# Altium PCB Main.PcbDoc
Units mm, origin at the board's own origin, x right, y up, seen from the top; angles counter-clockwise.
Board outline 25 x 42 mm, 2 copper layers (Top Layer, Bottom Layer); 7 components, 5 nets, 25 pads, 24 vias.
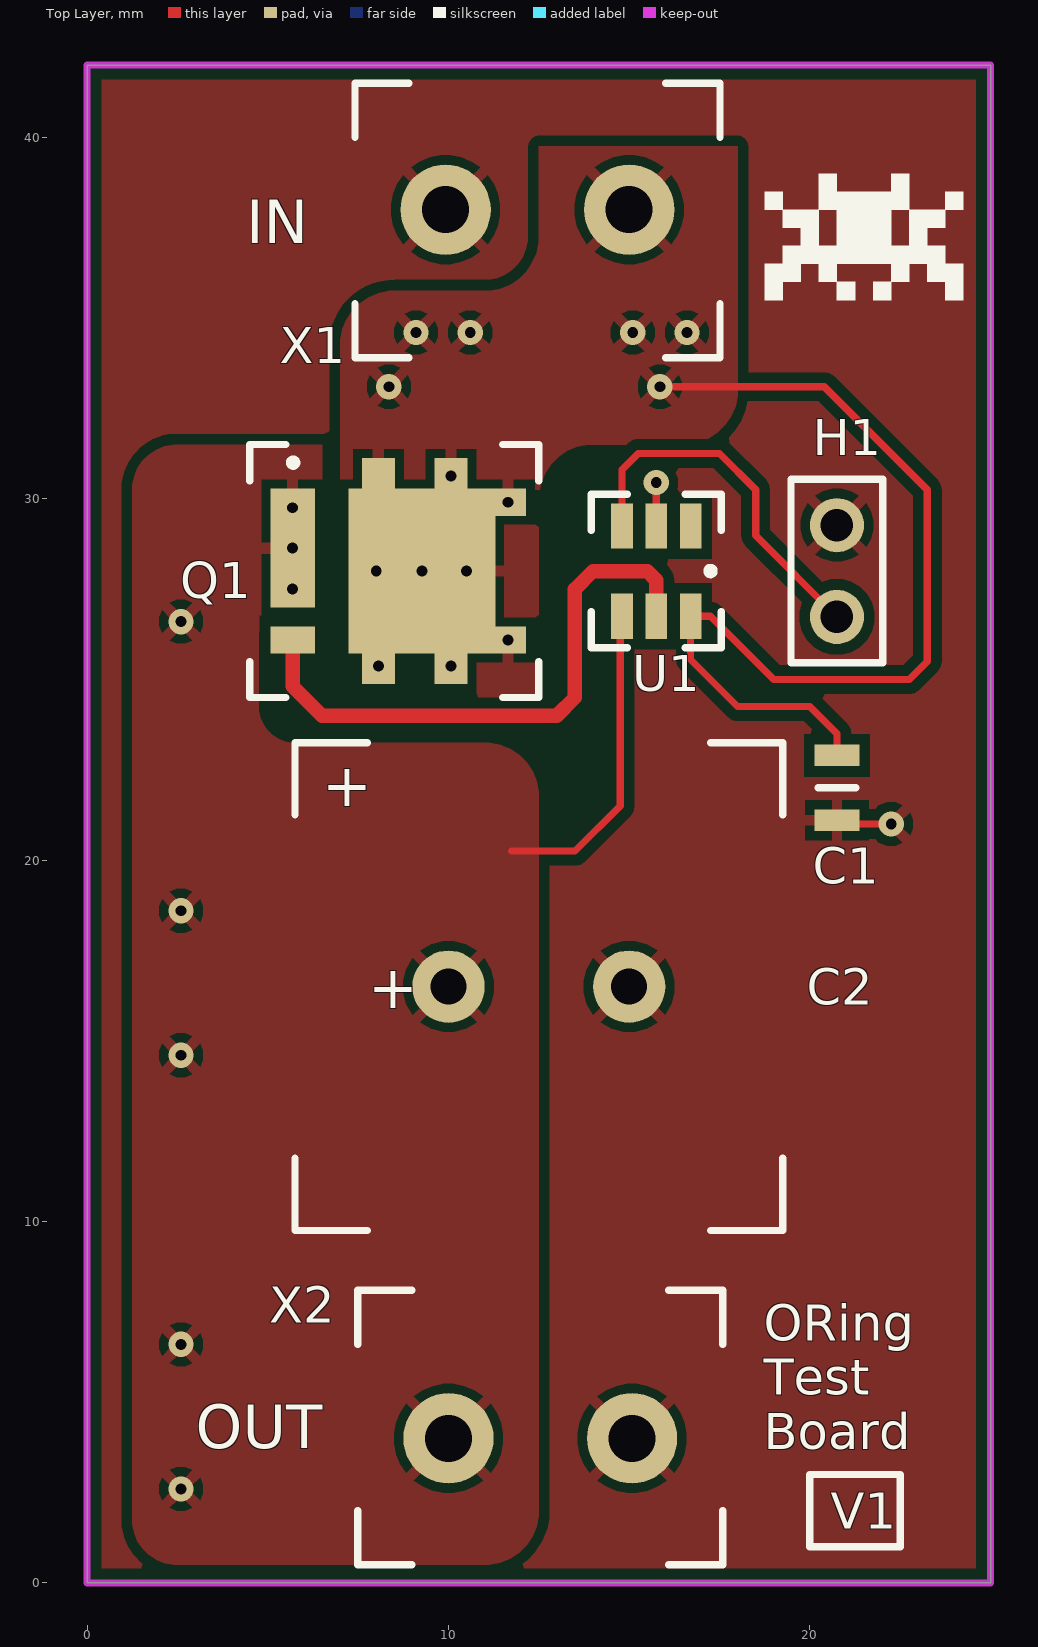
[diagram p0: Top Layer view]
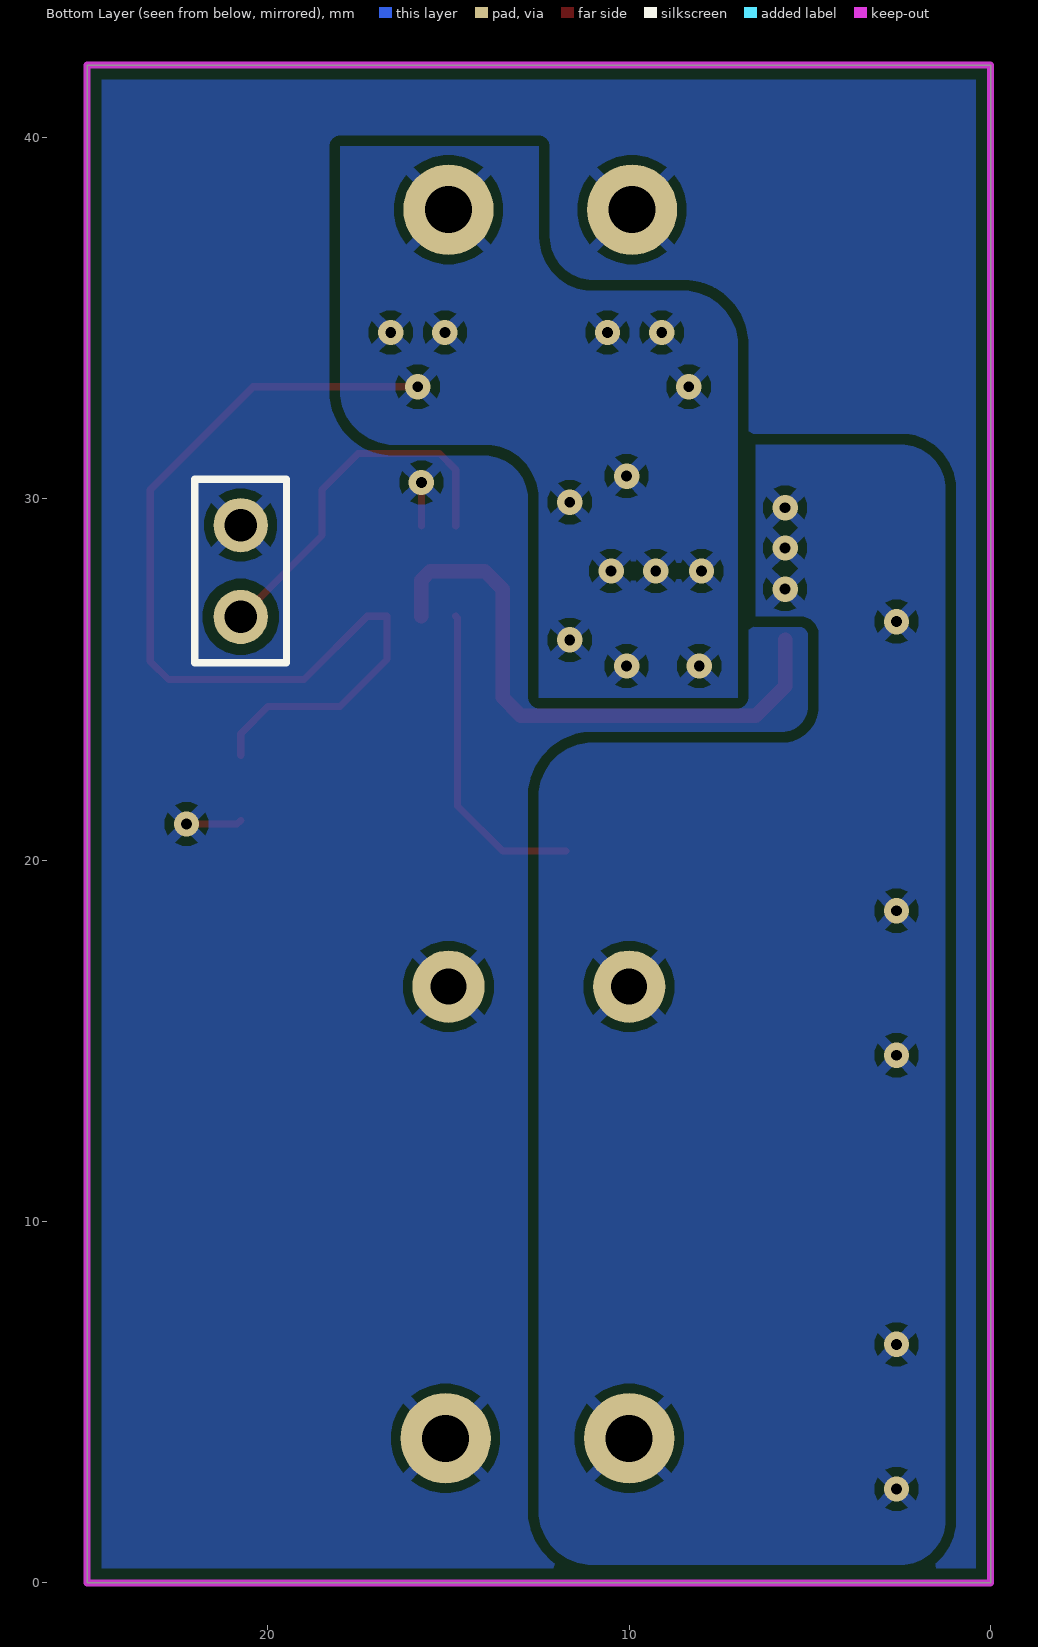
[diagram p1: Bottom Layer view, seen from below]
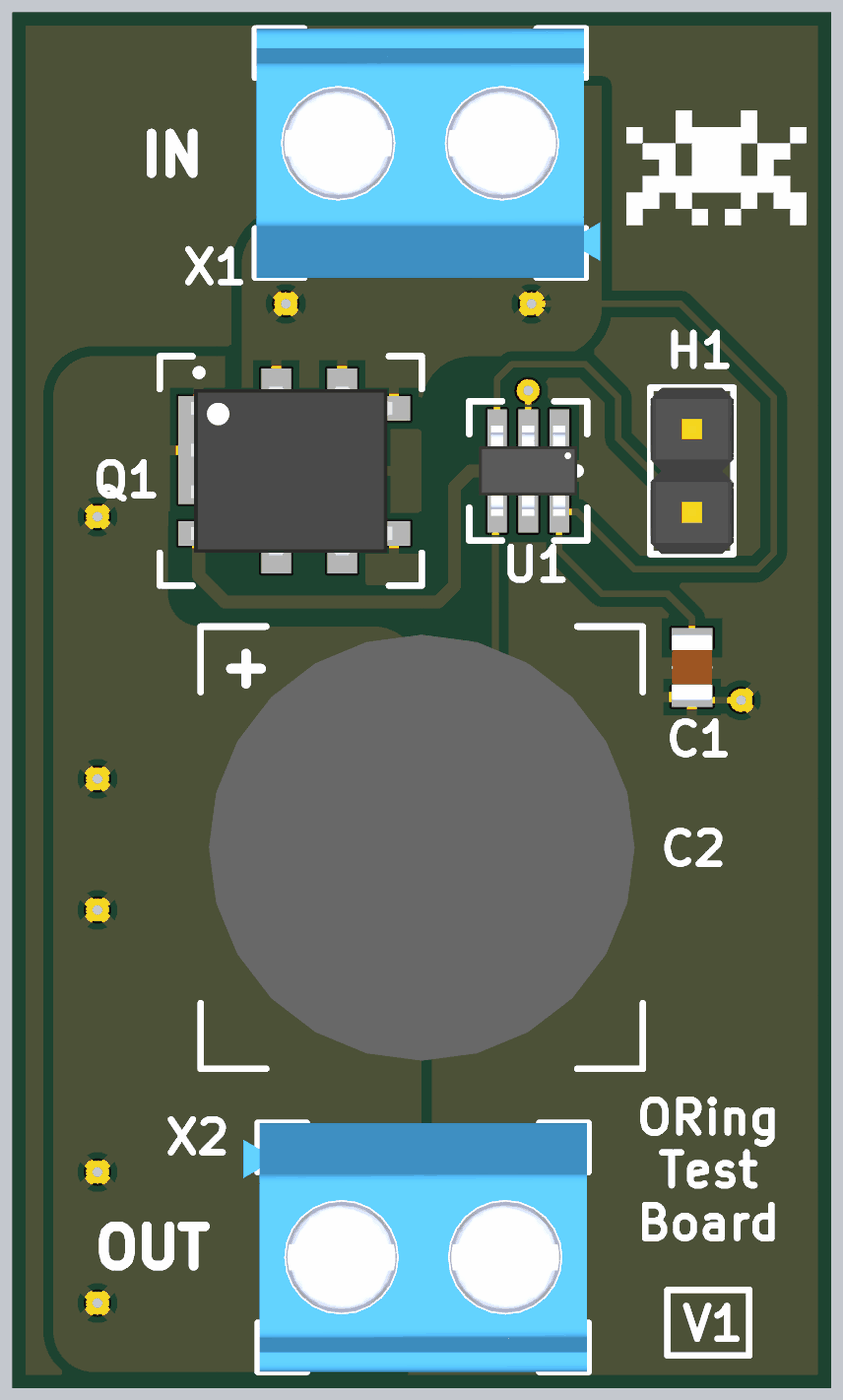
[diagram p2: 3D render of the assembled board from above, using the file's embedded part models]

## Layer stack, top to bottom
Top Solder: solder mask 0.0102, Solder Resist, Dk 3.5
Top Layer: signal copper 0.0356
Dielectric 1: dielectric 0.32, FR-4, Dk 4.8
Bottom Layer: signal copper 0.0356
Bottom Solder: solder mask 0.0102, Solder Resist, Dk 3.5

## Board outline
0,0 0,42 25,42 25,0

## Design rules (kind name [scope] priority, off if disabled: settings)
BoardOutlineClearance [All] p1: gap=0.2 ignorepadtopadclearanceinfootprint=FALSE
Clearance "inPolygon Clearance" [InPolygon] p1: gap=0.3 ignorepadtopadclearanceinfootprint=TRUE // this rule ensures that every net within a polygon of a different net has a set clearance from the poly
Clearance "Different Diff Pair" [All] p2: gap=0.2 ignorepadtopadclearanceinfootprint=TRUE
Clearance "Same Diff Pair" [All] p3: gap=0.1 ignorepadtopadclearanceinfootprint=TRUE
Clearance "Different Nets" [not InAnyDifferentialPair] p4: gap=0.3 ignorepadtopadclearanceinfootprint=TRUE except(0.1: Arc-SMDPad Arc-THPad Arc-Via Arc-Text Track-SMDPad Track-THPad Track-Via Track-Text SMDPad-Text THPad-Text Via-Text Fill-Text Poly-Text Region-Text Text-Text; 0.12: Arc-Arc Arc-Track Track-Track; 0.15: SMDPad-SMDPad SMDPad-THPad SMDPad-Via THPad-THPad THPad-Via Via-Via; 0.2: Arc-Hole Track-Hole SMDPad-Hole THPad-Hole Via-Hole Fill-Hole Poly-Hole Region-Hole Text-Hole)
Clearance "Same Net" [not InAnyDifferentialPair] p5: gap=0 ignorepadtopadclearanceinfootprint=TRUE except(0.1: THPad-Via; 0.18: Arc-Arc Arc-Track Track-Track)
ComponentClearance [All] p1: gap=0.102 collisioncheckmode=3 verticalgap=0.102 showdistances=TRUE
DiffPairsRouting "Ethernet Routing" [InDifferentialPairClass('Ethernet_Pairs')] p1: maxlimit=0.2 minlimit=0.2 mostfreqgap=0.2 toplayer_minwidth=0.25 toplayer_maxwidth=0.25 toplayer_prefwidth=0.25 bottomlayer_minwidth=0.25 bottomlayer_maxwidth=0.25 bottomlayer_prefwidth=0.25 impedanceprofiledriven=TRUE maxuncoupledlength=12.7
DiffPairsRouting "USB Routing" [InDifferentialPairClass('USB_Pairs')] p2: maxlimit=0.127 minlimit=0.127 mostfreqgap=0.127 toplayer_minwidth=0.23 toplayer_maxwidth=0.23 toplayer_prefwidth=0.23 bottomlayer_minwidth=0.23 bottomlayer_maxwidth=0.23 bottomlayer_prefwidth=0.23 impedanceprofiledriven=TRUE impedanceprofileid={F14BA31F-77FA-453E-8734-53F45B48A614} maxuncoupledlength=12.7
DiffPairsRouting "CAN Routing" [InDifferentialPairClass('CAN_Pairs')] p3: maxlimit=0.5 minlimit=0.5 mostfreqgap=0.5 toplayer_minwidth=0.201 toplayer_maxwidth=0.201 toplayer_prefwidth=0.201 bottomlayer_minwidth=0.201 bottomlayer_maxwidth=0.201 bottomlayer_prefwidth=0.201 maxuncoupledlength=12.7
Height [All] p1: minheight=0 maxheight=1816.048 prefheight=12.7
HoleSize [All] p1: absolutevalues=TRUE maxlimit=6.3 minlimit=0.3 maxpercent=80.000 minpercent=20.000
HoleToHoleClearance [All] p1: gap=0.25 allowstackedmicrovias=FALSE
Length [All] p1: maxlimit=43.432 minlimit=0 usedelayunits=TRUE mindelay=0.000000 maxdelay=10000.000000
MatchedLengths "Diff Pair Matched Delays" [InDifferentialPairClass('Ethernet_Pairs') or InDifferentialPairClass('USB_Pairs') or InDifferentialPairClass('CAN_Pairs')] p1: tolerance=5 checknetsindiffpair=TRUE checkdiffpairvsdiffpair=FALSE checkxsignals=FALSE checkothers=FALSE usedelayunits=TRUE delaytolerance=100.000000
MinimumAnnularRing [All] p1: minimumring=0.2
MinimumSolderMaskSliver [All] p1: minsoldermaskwidth=0
PlaneClearance "Supply Net Clearance" [InNetClass('Supply_Nets')] p1: clearance=0.5
PlaneClearance "All Nets" [All] p2: clearance=0.3
PolygonConnect "Supply Nets" [InNetClass('Supply_Nets')] p1: connectstyle=Relief reliefconductorwidth=0.3 reliefentries=4 polygonreliefangle="90 Angle" conductorbypadedge=TRUE mindistance=0.381 enablemindistance=FALSE airgapwidth=0.254
PolygonConnect General [All] p2: connectstyle=Relief reliefconductorwidth=0.254 reliefentries=4 polygonreliefangle="90 Angle" airgapwidth=0.254
RoutingVias [All] p1: holewidth=0.2 width=0.35 viastyle="Through Hole" minholewidth=0.15 minwidth=0.3 maxholewidth=6.3 maxwidth=6.55
SilkToSilkClearance [All] p1: silktosilkclearance=0
SilkToSolderMaskClearance [All] p1: minsilkscreentomaskgap=0 clearancetoexposedcopper=TRUE
SolderMaskExpansion [All] p1: expansion=0.075 istentingtop=FALSE
SupplyNets "Schematic Supply Nets_3" [InNet('GND')] p1: voltage=0.000
UnRoutedNet [All] p1: checkbadconnections=TRUE
Width "nRF Width" [InNetClass('nRF Signal')] p1: maxlimit=0.379 minlimit=0.379 preferedwidth=0.379 impedanceprofiledriven=TRUE minimp=50.000000 maximp=50.000000 favimp=50.000000 checkconnectedcopper=TRUE
Width [All] p2: maxlimit=100 minlimit=0.1 preferedwidth=0.3
20 further rules are at their usual default settings.

## Classes and differential pairs
net class Supply_Nets: "Batt EN" "Batt IN" "Batt OUT" GND NetQ1_2 NetU4_1
component class ORing: C1 C2 Q1 U1
component class Connectors: H1 X1 X2

## Components (designator, comment, footprint, x,y, rotation, side; value= is the part's Value field where it differs from the comment)
C1 "[Cap] 0805 0.1uF 10% 50V" "[Cap] SMD 0805" 20.75,22 r270 top
C2 "[Cap] Thru-Hole 1000uF 20% 35V" "[Cap] Thru-Hole Polarized 10mm" 12.5,16.5 r0 top
H1 "1x2 Header" "[Header] 1x2 Male" 20.75,28 r90 top
Q1 "NMOS" "[NMOS] SMD 40V 509A" 8.5,28 r270 top
U1 "[ORing] NMOS Controller" "[ORing] NMOS Controller" 15.75,28 r270 top
X1 "2pin Screw Terminal" "[Screw Terminal] 2pin 5mm" 12.5,38 r180 top
X2 "2pin Screw Terminal" "[Screw Terminal] 2pin 5mm" 12.5,4 r0 top

## Footprints (in the part's own frame and the unit in brackets; to place one, negate y for a bottom-side part, rotate by r counter-clockwise, add the part's x,y. Pads: shape width x height; smd on the part's side, far side on the other; paste and mask are expansions set on the pad)
"[Cap] SMD 0805" [mm]
  rect 0.6x1.25 smd: 1(-0.9,0) 2(0.9,0)
  silkscreen extent 0,-0.53 0,0.53, body extent -1,-0.63 1,0.63, height 1
"[Cap] Thru-Hole Polarized 10mm" [mm]
  round 2 hole 1: 1(-2.5,0) 2(2.5,0)
  silkscreen extent -6.75,-6.75 6.75,6.75, body extent -6.5,-6.49 6.5,6.49, height 26.5
"[Header] 1x2 Male" [mm]
  round 1.5 hole 0.9: 1(-1.27,0) 2(1.27,0)
  silkscreen extent -2.54,-1.27 2.54,1.27, body extent -2.54,-1.27 2.54,1.27, height 9.5
"[NMOS] SMD 40V 509A" [mm] "NTMFS0D4N04XMT1G"
  rect 3.29x1.23 smd: 1(-0.635,-2.815)
  rect 0.75x1.23 smd: 2(1.905,-2.815)
  rect 1x0.91 smd: 3(-2.627,1.57) 3(-2.627,-0.44) 3(2.627,1.57) 3(2.627,-0.44)
  rect 0.75x1 smd: 3(-1.905,3.145) 3(1.905,3.145)
  rect 4.56x4.06 smd: 3(0,0.765)
  silkscreen extent -3.5,-4 3.5,4, body extent -2.58,-3.05 2.58,3.1, height 1
"[ORing] NMOS Controller" [mm]
  rect 1.25x0.6 smd: 1(-1.25,0.95) 2(-1.25,0) 3(-1.25,-0.95) 4(1.25,-0.95) 5(1.25,0) 6(1.25,0.95)
  silkscreen extent -2.12,-1.8 2.12,1.8, body extent -1.38,-1.5 1.38,1.5, height 1.1
"[Screw Terminal] 2pin 5mm" [mm]
  round 2.5 hole 1.3: 1(-2.5,0) 2(2.58,0)
  silkscreen extent -5.01,-3.5 5.09,4.1, body extent -5.45,-3.5 5.05,4.1, height 9.99

## Part data
C1: "CL21B104KBCNNNC", Capacitance=100nF, Max Voltage=50V, Size Package=0805, Supplier Part Number 1=1276-1003-6-ND, Tolerance=10%, Supplier 1=DigiKey
C2: "35PK1000MEFC10X20", Capacitance=1000uF, Max Voltage=35V, Size Package=Thru-Hole, Supplier Part Number 1=399-9886-1-ND, Tolerance=20%, Supplier 1=DigiKey
H1: library part "[Header] 1x2 Male", "2.54mm pitch"
Q1: library part "[NMOS] SMD 40V 509A", "NTMFS0D4N04XMT1G", Supplier Part Number 1=488-NTMFS0D4N04XMT1GCT-ND, Supplier 1=DigiKey
U1: "NCV68061SNAIT1G", Supplier Part Number 1=488-NCV68061SNAIT1GCT-ND, Supplier 1=DigiKey
X1 X2: library part "[Screw Terminal] 2pin", "TB002-500-02BE", Supplier Part Number 1=102-6145-ND, Supplier 1=DigiKey

## Via types
v1: diameter 0.7, hole 0.3, Top Layer to Bottom Layer, 24 vias

## Nets (pads, with @x,y where several pads share a name; then routed paths per layer and width w, separated by ;. In a path a pad name is that pad's centre, name@x,y a point inside that pad or via, vN(x,y) a via of type N, cw(c..) or ccw(c..) an arc to the next point about the centre after c; other vN are vias at no path point)
"Batt EN": H1.1 U1.3 | length 10.3
  Top Layer w0.2: U1.3 14.8,30.8 15.25,31.25 17.5,31.25 18.5,30.25 18.5,28.98 H1.1
"Batt IN": C1.1 Q1.3 U1.6 X1.1 | length 27.5
  Top Layer w0.2: v1(15.85,33.1) 20.4,33.1 23.25,30.25 23.25,25.5 22.75,25 19,25 17.25,26.75 U1.6 16.7,25.55 18,24.25 20,24.25 20.75,23.5 C1.1
  other v1: 8.06,25.373 10.07,25.373 11.645,26.095 8,28 9.265,28 10.5,28 11.645,29.905 10.07,30.627 8.35,33.1 9.1,34.6 10.6,34.6 15.1,34.6 16.6,34.6
"Batt OUT": C2.1 Q1.1 U1.4 X2.1 | length 8.8
  Top Layer w0.2: 11.75,20.25 13.5,20.25 14.75,21.5 14.75,26.7 U1.4
  other v1: 2.6,2.6 2.6,6.6 2.6,14.6 2.6,18.6 2.6,26.6 5.685,27.5 5.685,28.635 5.685,29.75
GND: C1.2 C2.2 H1.2 U1.2 X1.2 X2.2 | length 2.7
  Top Layer w0.2: U1.2 v1(15.75,30.45) ; C1.2 20.85,21 v1(22.25,21)
NetQ1_2: Q1.2 U1.5 | length 16.2
  Top Layer w0.4: Q1.2 5.685,24.815 6.5,24 13,24 13.5,24.5 13.5,27.5 14,28 15.5,28 15.75,27.75 U1.5
pads on no net: U1.1

## Polygon pours and split planes (outlines as drawn)
GND on Top Layer "GND Top Poly" (solid, remove dead copper, pour order 8): 0,0 25,0 25,42 0,42
"Batt OUT" on Top Layer "Batt Out Top Poly" (solid, remove dead copper, pour order 3): 11,23.25 5.75,23.25 cw(c5.75,24.25) 4.75,24.25 4.75,26.25 cw(c5.25,26.25) 5.25,26.75 6.5,26.75 6.5,31.5 2.5,31.5 ccw(c2.5,30.25) 1.25,30.25 1.25,1.75 ccw(c2.5,1.75) 2.5,0.5 11,0.5 ccw(c11,2) 12.5,2 12.5,21.75 ccw(c11,21.75)
"Batt IN" on Top Layer "Batt IN Top Poly" (solid, remove dead copper, pour order 0): 12.5,37.25 12.5,39.75 18,39.75 18,33 cw(c16.5,33) 16.5,31.5 14,31.5 ccw(c14,30) 12.5,30 12.5,24.5 7,24.5 7,34.25 cw(c8.5,34.25) 8.5,35.75 11,35.75 ccw(c11,37.25)
GND on Bottom Layer "GND Bottom Poly" (solid, remove dead copper, pour order 7): 0,0 25,0 25,42 0,42
"Batt OUT" on Bottom Layer "Batt Out Bottom Poly" (solid, remove dead copper, pour order 6): 11,23.25 5.75,23.25 cw(c5.75,24.25) 4.75,24.25 4.75,26.25 cw(c5.25,26.25) 5.25,26.75 6.5,26.75 6.5,31.5 2.5,31.5 ccw(c2.5,30.25) 1.25,30.25 1.25,1.75 ccw(c2.5,1.75) 2.5,0.5 11,0.5 ccw(c11,2) 12.5,2 12.5,21.75 ccw(c11,21.75)
"Batt IN" on Bottom Layer "Batt IN Bottom Poly" (solid, remove dead copper, pour order 5): 12.5,37.25 12.5,39.75 18,39.75 18,33 cw(c16.5,33) 16.5,31.5 14,31.5 ccw(c14,30) 12.5,30 12.5,24.5 7,24.5 7,34.25 cw(c8.5,34.25) 8.5,35.75 11,35.75 ccw(c11,37.25)

## Keep-outs
Keep-Out Layer:
  the board outline again, w0.2

## Silkscreen, mask and mechanical layers (free items; w line width, h text height)
Top Overlay:
  region: 20.937,35.5 20.75,35.5 20.75,36 21.249,36 21.249,35.999 21.25,35.999 21.25,35.5 20.937,35.5
  region: 18.75,38.36 18.75,38.5 19.249,38.5 19.249,38.499 19.25,38.499 19.25,38 18.75,38 18.75,38.359
  region: 23.75,38.154 23.75,38.499 23.751,38.499 23.751,38.5 24.25,38.5 24.25,38 23.75,38 23.75,38.153
  region: 22.25,35.96 22.25,35.5 21.75,35.5 21.75,35.999 21.751,35.999 21.751,36 22.25,36 22.25,35.961
  region: 20.259,39 20.75,39 20.75,38.5 22.25,38.5 22.25,39 22.75,39 22.75,38 22.25,38 22.25,37 22.75,37 22.75,38 23.75,38 23.75,37.501 23.749,37.501 23.749,37.5 23.25,37.5 23.25,37 23.749,37 23.749,36.999 23.75,36.999 23.75,36.5 24.25,36.5 24.25,35.5 23.75,35.5 23.75,36 23.251,36 23.251,36.001 23.25,36.001 23.25,36.5 22.75,36.5 22.75,36.001 22.749,36.001 22.749,36 22.25,36 22.25,36.5 20.75,36.5 20.75,36 20.251,36 20.251,36.001 20.25,36.001 20.25,36.5 19.75,36.5 19.75,36.001 19.749,36.001 19.749,36 19.25,36 19.25,35.5 18.75,35.5 18.75,36.5 19.25,36.5 19.25,36.999 19.251,36.999 19.251,37 19.75,37 19.75,37.5 19.251,37.5 19.251,37.501 19.25,37.501 19.25,38 20.25,38 20.25,37 20.75,37 20.75,38 20.25,38 20.25,39 20.258,39
  lines w0.2: 20,1 22.5,1 22.5,3 20,3 20,1
  text "IN" at 4.401,37.075 h1.2
  text "OUT" at 3.001,3.725 h1.2
  text "ORing / Test / Board" at 18.717,3.704 h1
  text "V1" at 20.584,1.5 h1
Poly Planning:
  lines w0.2: 1.25,0.5 12.5,0.5 12.5,23.25 4.75,23.25 4.75,26.75 6.5,26.75 6.5,31.5 1.25,31.5 1.25,0.5 ; 7,24.5 12.5,24.5 12.5,31.5 18,31.5 18,39.75 12.5,39.75 12.5,35.75 7,35.75 7,24.5

## Text inside footprints (layer, text, board x,y; h text height)
C2: Top Overlay "+" at 6.512,21.488 h1.2; Top Overlay "+" at 7.782,15.9 h1.2